# EAGLE board ecad-receiver-v5-receiver-brd (EAGLE 9.7.0)
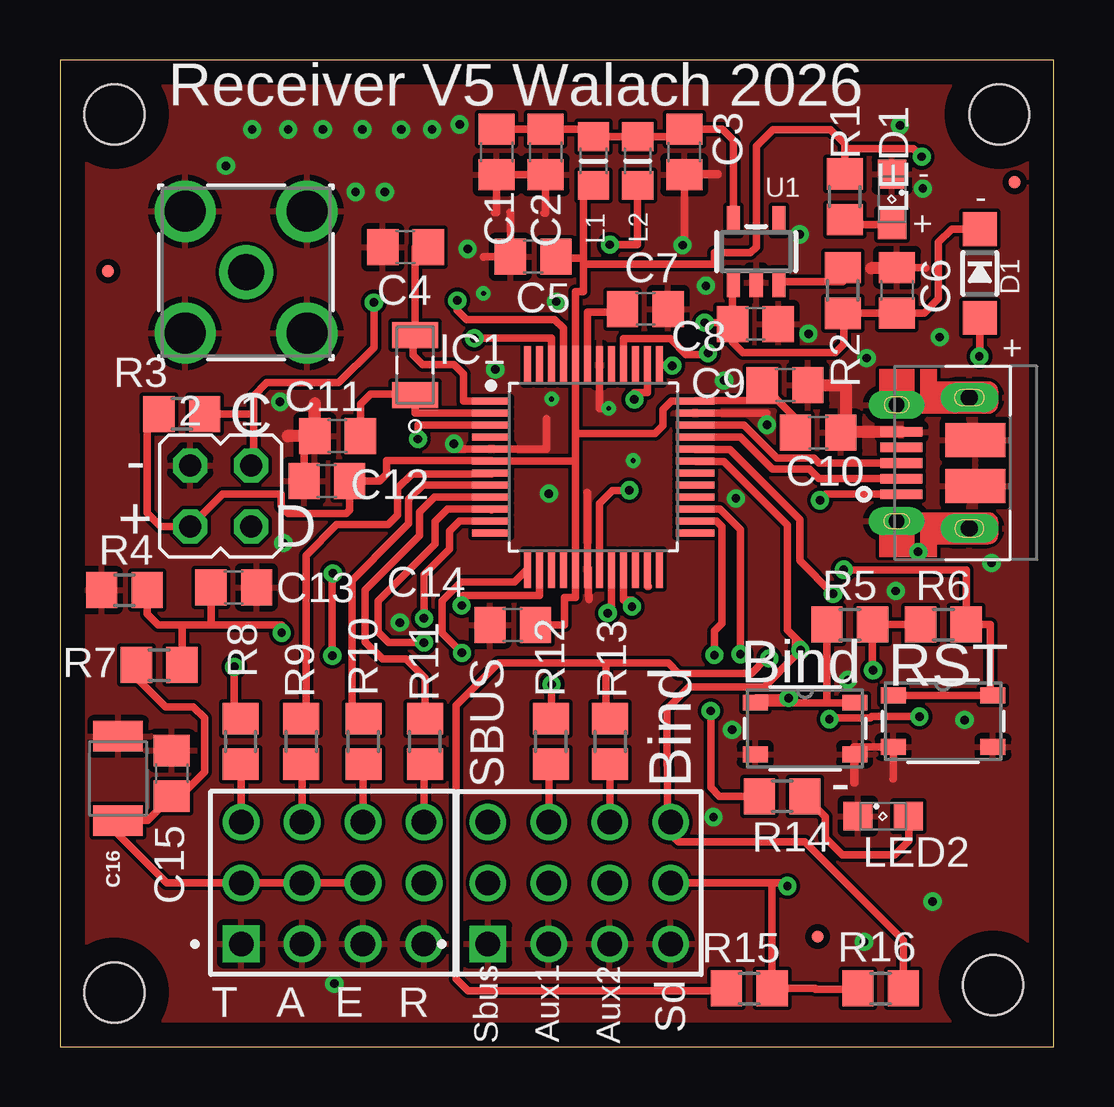
[diagram p0: board, top side]
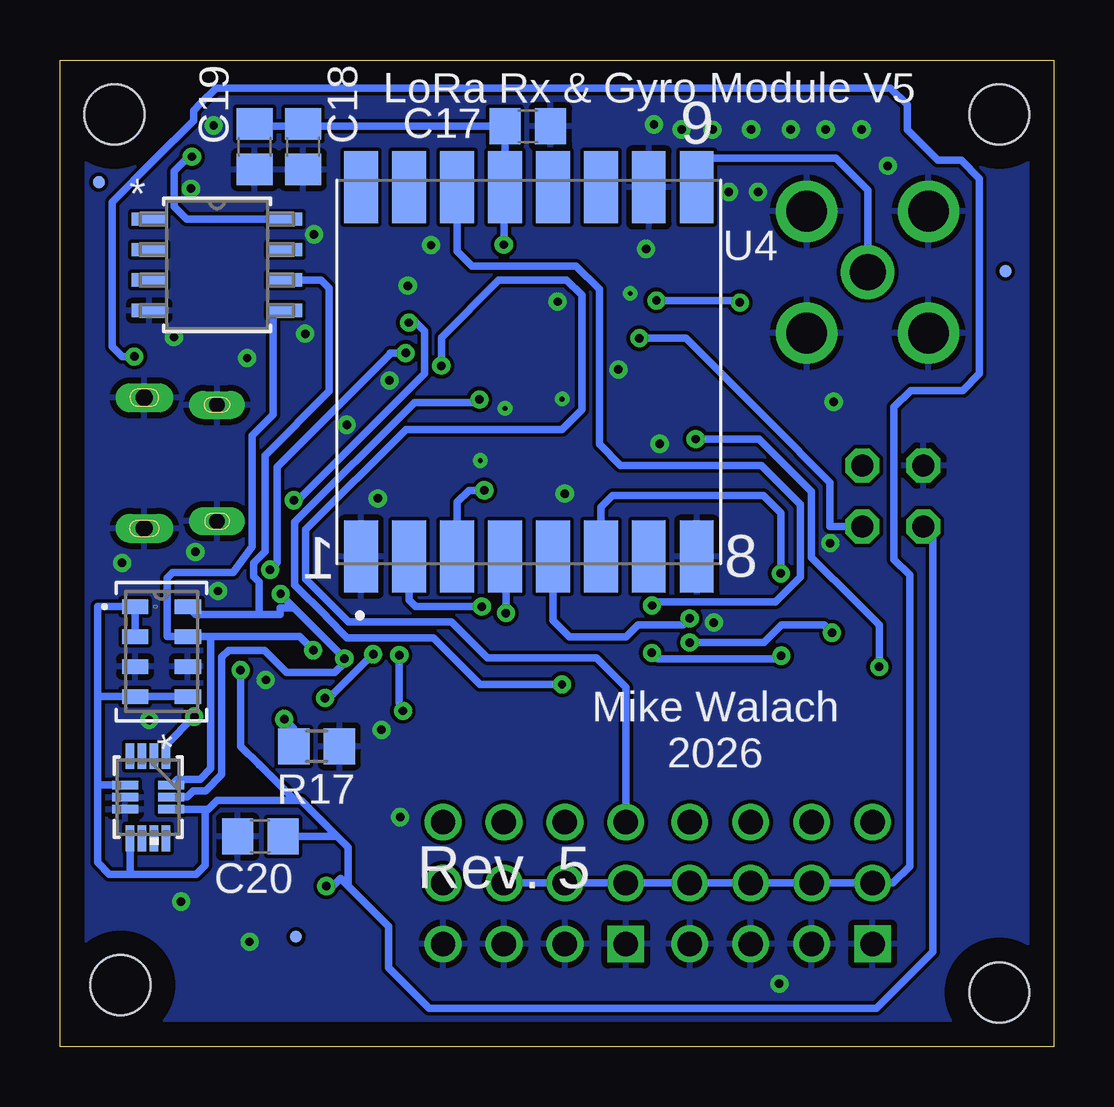
[diagram p1: board, bottom side, seen from below]

Size 41.42 x 41.13 mm. Coordinates in mm from the lower left corner, seen from the top.
Outline: 0,0 41.42,0 41.42,41.13 0,41.13 0,0
Copper layers (1*16): Top 0.035mm / dielectric 1.5mm / Bottom 0.035mm
Design rules "Fusion Electronics Design Rules": minimum track width 6mil, minimum drill 0.35mm, track to track 6mil, track to pad 6mil, pad to pad 6mil, via to via 6mil, smd to smd 6mil, copper to edge 40mil, drill to drill 6mil, minimum pad ring 10mil, minimum via ring 8mil, stop-mask expansion 4mil, vias tented up to drill 9999mil, thermal gap 10mil
Holes 2.5 mm at 2.27,2.27 38.9,2.57 39.16,38.87 2.27,38.87

## Footprints (pad centres in the part's own frame; a part is rotated, then mirrored left to right if it is on the bottom)
C0805 = smd 1.3 x 1.5: 1 -0.95,0; 2 0.95,0
1210 = smd 1.27 x 2.06: 1 -1.755,0; 2 1.755,0
MICROBUILDER_SOD-123 = smd 1.4 x 1.4: A 1.85,0; C -1.85,0
FID_020 = smd 0.508 x 0.508 bottom: FIDB 0,0 | smd 0.508 x 0.508: FIDT 0,0
QFP50P900X900X120-48 = smd 1.6 x 0.3: 1 -4.25,2.75; 2 -4.25,2.25; 3 -4.25,1.75; 4 -4.25,1.25; 5 -4.25,0.75; 6 -4.25,0.25; 7 -4.25,-0.25; 8 -4.25,-0.75; 9 -4.25,-1.25; 10 -4.25,-1.75; 11 -4.25,-2.25; 12 -4.25,-2.75; 25 4.25,-2.75; 26 4.25,-2.25; 27 4.25,-1.75; 28 4.25,-1.25; 29 4.25,-0.75; 30 4.25,-0.25; 31 4.25,0.25; 32 4.25,0.75; 33 4.25,1.25; 34 4.25,1.75; 35 4.25,2.25; 36 4.25,2.75 | smd 0.3 x 1.6: 13 -2.75,-4.25; 14 -2.25,-4.25; 15 -1.75,-4.25; 16 -1.25,-4.25; 17 -0.75,-4.25; 18 -0.25,-4.25; 19 0.25,-4.25; 20 0.75,-4.25; 21 1.25,-4.25; 22 1.75,-4.25; 23 2.25,-4.25; 24 2.75,-4.25; 37 2.75,4.25; 38 2.25,4.25; 39 1.75,4.25; 40 1.25,4.25; 41 0.75,4.25; 42 0.25,4.25; 43 -0.25,4.25; 44 -0.75,4.25; 45 -1.25,4.25; 46 -1.75,4.25; 47 -2.25,4.25; 48 -2.75,4.25
10103594 = smd 0.4 x 1.75: 1 -1.3,2.825; 2 -0.65,2.825; 3 0,2.825; 4 0.65,2.825; 5 1.3,2.825 | smd 1.425 x 2.5: 6 -0.963,-0.25; 7 0.963,-0.25 | drill 0.65 pad 0.73 long: SH1 -2.425,3.03; SH2 2.425,3.03 | drill 0.7 long: SH3 -2.725,0; SH4 2.725,0
TSW-104-07-F-T_SAMTEC_TSW-104-07-F-T = drill 1.02 pad 1.37 square: 01 -3.81,-2.54 | drill 1.02 pad 1.37: 02 -3.81,0; 03 -3.81,2.54; 04 -1.27,-2.54; 05 -1.27,0; 06 -1.27,2.54; 07 1.27,-2.54; 08 1.27,0; 09 1.27,2.54; 10 3.81,-2.54; 11 3.81,0; 12 3.81,2.54
JP2Q = drill 0.914 octagon: 1 -1.27,-1.27; 2 -1.27,1.27; 3 1.27,-1.27; 4 1.27,1.27
RC-MASTER-SMD_L0805MP = smd 1.2 x 1.3: 1 -1.016,0; 2 1.016,0
SML0805 = smd 1.2 x 1.2: A 1.05,0; C -1.05,0
R0805 = smd 1.3 x 1.5: 1 -0.95,0; 2 0.95,0
PTS810 = smd 1.041 x 0.66: 1 -2.075,1.075; 2 2.075,1.075; 3 -2.075,-1.075; 4 2.075,-1.075
MICROBUILDER_SOT23-5 = smd 0.55 x 1.2: 1 -0.95,-1.3; 2 0,-1.3; 3 0.95,-1.3; 4 0.95,1.3; 5 -0.95,1.3
132134_AMP = drill 1.499 pad 2.007: 1 0,0 | drill 1.702 pad 2.21: 2 -2.54,2.54; 3 -2.54,-2.54; 4 2.54,-2.54; 5 2.54,2.54
FPT-8P-M02_FUJ = smd 1.448 x 0.559: 1 -2.832,1.905; 2 -2.832,0.635; 3 -2.832,-0.635; 4 -2.832,-1.905; 5 2.832,-1.905; 6 2.832,-0.635; 7 2.832,0.635; 8 2.832,1.905
XCVR_RFM95W-915S2 = smd 3 x 1.4: 1 -7.7,7; 2 -7.7,5; 3 -7.7,3; 4 -7.7,1; 5 -7.7,-1; 6 -7.7,-3; 7 -7.7,-5; 8 -7.7,-7; 9 7.7,-7; 10 7.7,-5; 11 7.7,-3; 12 7.7,-1; 13 7.7,1; 14 7.7,3; 15 7.7,5; 16 7.7,7
SON8_MS5611_TEC = smd 1.092 x 0.61: 1 -1.1,1.875; 2 -1.1,0.625; 3 -1.1,-0.625; 4 -1.1,-1.875; 5 1.1,-1.875; 6 1.1,-0.625; 7 1.1,0.625; 8 1.1,1.875
LGA-14L_2P5X3X0P83_STM = smd 1.077 x 0.351: 1 -1.71,0.75; 2 -1.71,0.25; 3 -1.71,-0.25; 4 -1.71,-0.75; 8 1.71,-0.75; 9 1.71,-0.25; 10 1.71,0.25; 11 1.71,0.75 | smd 0.351 x 1.077: 5 -0.5,-0.956; 6 0,-0.956; 7 0.5,-0.956; 12 0.5,0.956; 13 0,0.956; 14 -0.5,0.956
XTAL_ABS07-32.768KHZ-T = smd 1.1 x 1.9: 1 -1.25,0; 2 1.25,0

## Placement (x,y rotation side)
C1  1uF  [C0805]  18.2,37.3 270 top
C2  10uF  [C0805]  20.24,37.3 270 top
C3  0.1uF  [C0805]  26.02,37.3 270 top
C4  22pF  [C0805]  14.41,33.33 180 top
C5  0.1uF  [C0805]  19.72,32.94 180 top
C6  10uF  [C0805]  34.89,31.53 90 top
C7  1uF  [C0805]  24.4,30.76 0 top
C8  220uF  [C0805]  28.99,30.13 0 top
C9  0.1uF  [C0805]  30.22,27.58 0 top
C10  1uF  [C0805]  31.6,25.59 0 top
C11  22pF  [C0805]  11.57,25.45 180 top
C12  0.1uF  [C0805]  11.12,23.59 180 top
C13  0.1uF  [C0805]  7.24,19.15 0 top
C14  0.1uF  [C0805]  18.87,17.59 180 top
C15  100nF  [C0805]  4.66,11.4 90 top
C16  22uF  [1210]  2.43,11.19 90 top
C17  1uF  [C0805]  21.92,38.37 0 bottom
C18  0.1uF  [C0805]  31.29,37.52 270 bottom
C19  10uF  [C0805]  33.31,37.52 270 bottom
C20  0.1uF  [C0805]  33.07,8.77 180 bottom
D1  [MICROBUILDER_SOD-123]  38.34,32.23 270 top
FD1  FID_20MIL  [FID_020]  39.8,36.04 0 top
FD2  FID_20MIL  [FID_020]  2.01,32.33 0 top
FD3  FID_20MIL  [FID_020]  31.59,4.59 0 top
IC1  ATSAMD21G  [QFP50P900X900X120-48]  22.23,24.16 0 top
J1  10103594  [10103594]  37.91,24.34 90 top
J2  3X4_MALE_HEADER  [TSW-104-07-F-T_SAMTEC_TSW-104-07-F-T]  11.36,6.83 0 top
J3  3X4_MALE_HEADER  [TSW-104-07-F-T_SAMTEC_TSW-104-07-F-T]  21.64,6.82 0 top
JP1  [JP2Q]  6.7,22.96 180 top
L1  [RC-MASTER-SMD_L0805MP]  22.24,36.92 270 top
L2  [RC-MASTER-SMD_L0805MP]  24.08,36.92 270 top
LED1  [SML0805]  34.68,35.32 270 top
LED2  [SML0805]  34.31,9.61 0 top
R1  2.2K  [R0805]  32.71,35.44 270 top
R2  100K  [R0805]  32.63,31.52 270 top
R3  1K  [R0805]  5.08,26.38 0 top
R4  1K  [R0805]  2.68,19.04 180 top
R5  1K  [R0805]  32.92,17.6 0 top
R6  1K  [R0805]  36.82,17.6 180 top
R7  10K  [R0805]  4.14,15.91 0 top
R8  330  [R0805]  7.53,12.73 270 top
R9  330  [R0805]  10.06,12.73 90 top
R10  330  [R0805]  12.65,12.73 270 top
R11  330  [R0805]  15.21,12.73 90 top
R12  330  [R0805]  20.46,12.73 90 top
R13  330  [R0805]  22.93,12.73 90 top
R14  2.2K  [R0805]  30.1,10.45 0 top
R15  10K  [R0805]  28.73,2.43 180 top
R16  10K  [R0805]  34.2,2.43 180 top
R17  1K  [R0805]  30.73,12.53 180 bottom
SW1  PTS810SJG250SMTRLFSPTS810  [PTS810]  36.81,13.57 0 top
SW2  PTS810SJG250SMTRLFSPTS810  [PTS810]  31.06,13.27 0 top
U1  [MICROBUILDER_SOT23-5]  29.02,33.15 0 top
U2  132134132134_AMP  [132134_AMP]  7.76,32.29 0 top
U3  MB85RC256VPNF-G-JNERE1FPT-8P-M02_FUJ  [FPT-8P-M02_FUJ]  34.88,32.59 0 bottom
U4  RFM95W-915S2  [XCVR_RFM95W-915S2]  21.87,28.13 90 bottom
U5  MS560702BA03-50SON8_MS5611_TEC  [SON8_MS5611_TEC]  37.19,16.47 0 bottom
U6  LSM6DSO32TRLGA-14L_2P5X3X0P83_STM  [LGA-14L_2P5X3X0P83_STM]  37.75,10.4 270 bottom
XTAL1  32.768kHz  [XTAL_ABS07-32.768KHZ-T]  14.8,28.41 90 top

## Library data of the parts
C1-C15 C17-C20 = rcl; SPICEPREFIX: C
C16 = SparkFun-Capacitors; PROD_ID: CAP-10381
D1 U1 = flightcomputer-2023
FD1-FD3 = fiducial; CATEGORY_L1: Fiducial Marks; DESCRIPTION: Fiducial Mark 0.508mm (20mil); PACKAGE: Surface Mount
IC1 = IC_Embedded; CATEGORY: IC_Embedded; CORE: ARM Cortex M0+; DESCRIPTION: Low-power, high-performance Microchip's ARM® Cortex®-M0+ based flash microcontroller; MANUFACTURER: Microchip Technology; MPN: ATSAMD21G; OPERATING_TEMP: variable; PACKAGE: TQFP-48; PART_STATUS: Active; ROHS_COMPLIANT: COMPLIANT; SERIES: SAM D21G; SUB-CATEGORY: Microcontroller; TYPE: 32 bit Microcontroller
J1 = Connector_USB; CATEGORY: Connectors; CONTACTS: 5; CURRENT-RATING: 1.8A; DESCRIPTION: CONN RCPT USB2.0 MICRO B SMD R/A; GENDER: Receptacle; MANUFACTURER: Amphenol ICC (FCI); MOUNT_TYPE: R/A; MPN: 10103594-0001LF; OPERATING_TEMPERATURE: -30°C ~ 80°C; PART_STATUS: ACTIVE; ROHS_COMPLIANT: COMPLIANT; SUB_CATEGORY: USB; TYPE: USB-micro B; VOLTAGE-RATING: 100VAC
J2 J3 = BOBCAT_Library; MANUFACTURER: Samtec; PARTREV: R; STANDARD: Manufacturer Recommendations
JP1 = jumper
L1 L2 = 52101-101-REV-A_v16
LED1 LED2 = led
R1-R17 = rcl; SPICEPREFIX: R
SW1 SW2 = 2024-06-17_17-27-14_Library; COPYRIGHT: Copyright (C) 2024 Ultra Librarian. All rights reserved.; MANUFACTURER_PART_NUMBER: PTS810SJG250SMTRLFS; MFR_NAME: C&K Components
U2 = 2025-03-19_02-22-58_Library; COPYRIGHT: Copyright (C) 2025 Ultra Librarian. All rights reserved.; MANUFACTURER_PART_NUMBER: 132134; MFR_NAME: Amphenol ICC
U3 = 2025-09-02_13-41-18_Library; COPYRIGHT: Copyright (C) 2025 Ultra Librarian. All rights reserved.; MANUFACTURER_NAME: Fujitsu Semiconductor; MANUFACTURER_PART_NUMBER: MB85RC256VPNF-G-JNERE1
U4 = RFM95W-915S2; AVAILABILITY: In Stock; CHECK_PRICES: https://www.snapeda.com/parts/RFM95W-915S2/RF/view-part/?ref=eda; DESCRIPTION: 802.15.4 LoRa™ Transceiver Module 915MHz Antenna Not Included Surface Mount; MF: RF Solutions; MP: RFM95W-915S2; PACKAGE: Non Standard RF Solutions; PRICE: None; PURCHASE-URL: https://www.snapeda.com/api/url_track_click_mouser/?unipart_id=585488&manufacturer=RF Solutions&part_name=RFM95W-915S2&search_term=None; SNAPEDA_LINK: https://www.snapeda.com/parts/RFM95W-915S2/RF/view-part/?ref=snap
U5 = 2025-03-19_19-02-07_Library; COPYRIGHT: Copyright (C) 2025 Ultra Librarian. All rights reserved.; MANUFACTURER_PART_NUMBER: MS560702BA03-50; MFR_NAME: TE Connectivity
U6 = LSM6DSO32TR_extendedpads_fixed_v2; COPYRIGHT: Copyright (C) 2026 Ultra Librarian. All rights reserved.; DATASHEET: https://www.st.com/resource/en/datasheet/lsm6dso32.pdf; DESCRIPTION: 6-axis IMU (inertial measurement unit): 3-axis accelerometer and 3-axis gyroscope; MANUFACTURER_NAME: STMicroelectronics; MANUFACTURER_PART_NUMBER: LSM6DSO32TR
XTAL1 = Crystal-WA; CATEGORY: Crystal; MANUFACTURER: Abracon LLC; MPN: ABS07-32.768KHZ-T; OPERATING_TEMPERATURE: -40°C ~ 85°C; PART_STATUS: ACTIVE; ROHS_COMPLIANT: COMPLIANT; SERIES: ABS07; SUB_CATEGORY: Crystal Surface Mount; TYPE: Crystal

## Nets
+3.3_LORA: C17.1 C18.1 C19.1 L2.2 U4.13
+3.3_MCU: C5.1 C9.1 C10.1 C12.1 C14.1 C20.1 IC1.6 IC1.17 IC1.36 IC1.44 J3.11 JP1.4 L1.2 R1.1 R3.1 R5.2 R6.2 R15.1 R16.2 U3.8 U5.1 U5.2 U5.4 U5.5 U6.5 U6.8 U6.12
+5V: C15.1 C16.1 D1.A J2.02 J2.05 J2.08 J2.11 J3.02 J3.05 J3.08 R7.1
A0: IC1.3 R8.1
A1: IC1.7 R9.2
A2: IC1.8 R10.1
A3: IC1.9 R11.2
A4: C13.1 IC1.10 R4.1 R7.2
A5: IC1.47
AREF: IC1.4
D0: IC1.16
D1: IC1.15
D2: IC1.23
D5: IC1.24
D6: IC1.29
D7: IC1.30
D9: IC1.12
D12: IC1.28
D13: IC1.26 R14.1
D+: IC1.34 J1.3
D-: IC1.33 J1.2
DIO0: IC1.14 U4.14
DIO1: U4.15
DIO2: U4.16
DIO3: U4.11
DIO4: U4.12
DIO5: U4.7
GND: C1.2 C2.2 C3.2 C4.2 C5.2 C6.2 C7.2 C8.2 C9.2 C10.2 C11.2 C12.2 C13.2 C14.2 C15.2 C16.2 C17.2 C18.2 C19.2 C20.2 IC1.5 IC1.18 IC1.35 IC1.42 J1.5 J1.6 J1.7 J1.SH1 J1.SH2 J1.SH3 J1.SH4 J2.01 J2.04 J2.07 J2.10 J3.01 J3.04 J3.07 J3.10 JP1.3 LED1.C LED2.C R4.2 R17.1 SW1.3 SW1.4 SW2.3 SW2.4 U1.2 U2.2 U2.3 U2.4 U2.5 U3.4 U4.1 U4.8 U4.10 U5.3 U5.6 U6.6 U6.7
LORA_ANT: U2.1 U4.9
LORA_RESET: IC1.13 U4.6
MISO: IC1.21 U4.2
MOSI: IC1.19 U4.3
N$1: R17.2 U6.1
N$2: C7.1 IC1.43
N$3: J3.06 R12.1
N$4: J2.12 R11.1
N$5: R2.1 U1.3
N$6: J3.09 R13.1
N$7: J2.09 R10.2
N$8: LED2.A R14.2
N$9: U3.7
N$10: J2.03 R8.2
N$11: U3.3
N$12: C11.1 IC1.2 XTAL1.1
N$13: U3.2
N$14: U3.1
N$15: C4.1 IC1.1 XTAL1.2
N$16: J2.06 R9.1
N$30: LED1.A R1.2
NSS: IC1.11 U4.5
OUT: C1.1 C2.1 C3.1 L1.1 L2.1 U1.5
RESET: IC1.40 R6.1 SW1.1 SW1.2
RXD: IC1.38 R12.2
RXLED: IC1.48
SCK: IC1.20 U4.4
SCL: IC1.32 R13.2 R15.2 U3.6 U5.8 U6.13
SDA: IC1.31 J3.12 R16.1 U3.5 U5.7 U6.14
SW1: IC1.27 R5.1 SW2.1 SW2.2
SW3: IC1.25
SWCLK: IC1.45 JP1.1 R3.2
SWDIO: IC1.46 JP1.2
TXD: IC1.37 J3.03
TXLED: IC1.39
VBUS: C6.1 C8.1 D1.C J1.1 R2.2 U1.1

## Tracks (layer width: path | path; a pad name or v marks a point on that pad's centre or on a via)
+3.3_LORA  (via drill 0.35)
  Top 0.305: L2.2 24.08,33.44 v22.92,33.44
  Bottom 0.305: v22.92,33.44 22.92,35.83 U4.13 C17.1 31.29,38.37 | 31.29,38.37 C18.1 | C19.1 33.31,38.37 31.29,38.37
+3.3_MCU  (via drill 0.35, 0.35 pad 0.25)
  Top 0.305: L1.2 21.82,35.9 21.82,32.88 | 21.82,32.88 20.67,32.88 C5.1 | 21.82,32.63 21.82,31.48 21.49,31.48 IC1.44 21.48,25.56 | 21.82,32.63 21.82,32.88 | 21.48,24.41 IC1.6 17.98,24.44 13.62,24.44 13.62,23.88 13.32,23.59 C12.1 12.07,22.38 11.92,22.23 9.52,22.23 9.21,22.54 9.21,23.04 6.78,23.04 JP1.4 4.2,21.69 3.63,22.26 3.63,25.89 R3.1 | 21.48,24.41 IC1.17 21.48,18.72 21.04,18.72 21.04,17.59 C14.1 | 29.92,26.94 26.5,26.94 IC1.36 25.48,26.91 25.13,26.56 25.13,25.9 24.79,25.56 21.48,25.56 | 21.48,25.56 21.48,24.41 | R6.2 R5.2 33.87,15.92 v33.89,15.7 | R1.1 32.71,37.45 | 32.71,37.45 32.71,37.65 32.12,38.23 29.72,38.23 29.02,37.53 29.02,33.34 28.79,33.1 27.27,33.1 27.27,32.63 21.82,32.63 | 29.92,26.94 C9.1 | C10.1 30.65,26.2 29.92,26.94 | v35.92,37.1 35.58,37.45 32.71,37.45 | R16.2 33.23,2.4 31.48,2.4 31.48,2.43 R15.1 29.69,6.78 29.64,6.82 | J3.11 29.64,6.82 | 29.64,6.82 30.2,6.82 v30.32,6.7
  Bottom 0.305: U5.5 U5.4 39.86,14.6 | U5.2 U5.1 39.86,18.35 39.86,14.6 | 31.63,10.28 33.11,11.75 33.13,11.75 33.13,11.76 33.89,12.53 v33.89,15.7 | 29.88,8.77 31.38,10.28 31.63,10.28 | v35.92,37.1 36.05,37.1 36.66,36.5 36.66,35.02 36.13,34.5 U3.8 | C20.1 29.88,8.77 | 31.63,10.28 34.87,10.28 35.24,9.9 35.37,9.9 | 39.86,14.6 39.86,10.93 | 39.86,10.93 39.86,7.68 39.37,7.19 38.5,7.19 | JP1.4 5.05,21.3 5.05,3.96 7.4,1.6 26.05,1.6 27.73,3.29 27.73,5.02 29.41,6.71 | 29.88,8.77 29.41,8.31 29.41,6.71 | 29.41,6.71 29.73,7.02 30.05,6.7 v30.32,6.7 | 38.5,7.19 35.75,7.19 35.37,7.57 35.37,9.9 | U6.12 35.37,9.9 | U6.5 38.73,10.93 39.86,10.93 | U6.8 38.5,7.19
+5V  (via drill 0.35)
  Top 0.305: v38.32,28.78 38.34,28.78 D1.A | J2.08 J2.05 J2.02 4.44,6.83 2.32,8.95 | 4.29,10.08 C15.1 | R7.1 3.19,15.39 4.41,14.17 5.55,14.17 6.03,13.7 6.03,11.47 5.01,10.45 C15.1 | C15.1 3.65,9.43 C16.1
  Bottom 0.305: 37.51,36.95 35.85,38.61 35.85,39.03 35.57,39.31 34.91,39.97 6.81,39.97 6.11,39.27 6.11,38.22 4.84,36.95 3.85,36.95 3.09,36.19 3.09,28.06 3.79,27.36 5.96,27.36 6.66,26.66 6.66,20.31 6,19.66 6,7.52 6.7,6.83 J2.02 J2.05 J2.08 J2.11 J3.02 J3.05 J3.08 | 37.51,36.95 37.52,36.95 | v38.32,28.78 v38.32,28.77 38.84,28.77 39.26,29.19 39.26,35.2 37.51,36.95
A0  (via drill 0.35)
  Top 0.305: IC1.3 14.92,25.91 v14.92,25.34 | v7.27,15.84 7.27,13.94 R8.1
  Bottom 0.305: v7.27,15.84 7.27,17.58 8.23,18.54 10.1,20.4 10.1,23.14 12.3,25.34 v14.92,25.34
A1
  Top 0.305: IC1.7 17.98,23.87 14.67,23.87 14.08,23.29 14.08,22.17 13.69,21.77 11.54,21.77 10.25,20.48 10.25,13.87 R9.2
A2
  Top 0.305: IC1.8 15.13,23.41 14.54,22.82 14.54,21.8 14.02,21.28 12.17,19.44 12.17,14.16 R10.1
A3
  Top 0.305: IC1.9 15.61,22.91 15,22.3 15,21.32 14.5,20.83 12.72,19.05 12.72,16.88 13.44,16.17 14.42,16.17 15.21,15.38 R11.2
A4  (via drill 0.35)
  Top 0.305: v15.17,16.85 13.7,16.85 13.26,17.29 13.26,18.58 14.97,20.3 15.64,20.96 15.64,21.89 16.16,22.41 IC1.10 17.98,22.37 | 6.3,17.59 9.24,17.59 v9.24,17.26 | 6.3,17.59 5.09,17.59 | 5.09,17.59 4.1,17.59 3.63,18.05 R4.1 | C13.1 6.3,17.59 | R7.2 5.09,17.59
  Bottom 0.305: v15.17,16.85 12.09,16.85 11.36,17.58 9.56,17.58 v9.24,17.26
D2
  Top 0.305: IC1.23 24.48,19.18 24.53,19.18
D13  (via drill 0.35)
  Top 0.305: R14.1 27.5,10.45 27.13,10.82 v27.13,14 | IC1.26 27.37,21.91 27.59,21.69 27.59,17.65 27.28,17.34 v27.28,16.33
  Bottom 0.305: v27.13,14 27.13,14.17 27.28,14.32 v27.28,16.33
D+
  Top 0.305: IC1.34 28.5,25.91 29.88,24.54 31.42,24.54 31.63,24.34 J1.3
D-
  Top 0.305: IC1.33 28.36,25.41 29.69,24.08 31.23,24.08 31.63,23.69 J1.2
DIO0  (via drill 0.35)
  Top 0.305: v16.74,18.4 16.79,18.4 16.79,18.81 19.98,18.81 IC1.14
  Bottom 0.305: 24.46,35.42 U4.14 24.87,33.17 24.25,32.55 19.91,32.55 18.94,31.58 18.94,25.12 18.06,24.23 12.19,24.23 10.55,22.6 10.55,19.59 11.59,18.55 16.59,18.55 v16.74,18.4
GND  (via drill 0.2 pad 0.25, 0.35, 0.35 pad 0.25)
  Top 0.305: C12.2 10.17,25.45 C11.2 | 21.98,23.11 IC1.18 22.03,19.91 22.03,18.81 22.06,18.81 22.06,18.65 | C3.2 26.02,33.42 v25.95,33.42 | C3.2 27.42,36.35 27.42,36.4 26.02,36.4 C3.2 | 18.12,34.76 18.2,34.76 C1.2 C2.2 20.24,34.75 20.17,34.75 | 18.76,34.8 18.77,34.8 C5.2 17.66,32.94 17.66,32.92 | C8.2 29.94,30.27 | C6.2 36.1,32.48 36.1,32.47 | IC1.42 22.48,26.61 v22.87,26.61 | IC1.35 29.47,26.41 v29.47,25.92 | v16.42,25.13 16.42,24.91 IC1.5 20.28,24.91 20.28,26.18 | SW2.4 33.13,11 33.09,11 33.09,12.5 SW1.3 34.74,11.16 34.72,11.16
  Top 0.508: C6.2 34.89,32.45 33.81,32.45 | C9.2 32.75,27.58 32.75,25.59 C10.2 32.59,25.63 J1.5 | C11.2 10.62,26.82 C11.2 | C11.2 9.49,25.45 9.49,25.48 | 1.71,19.04 R4.2
  other vias: 9.17,26.88 6.92,36.72 8.01,38.24 9.51,38.24 10.96,38.24 12.61,38.24 14.22,38.23 13.54,35.63 12.32,35.63 36.67,29.59 35.97,35.78 35.02,38.41 16.99,33.26 26.93,31.73 31.2,29.72 9.31,20.99 16.66,38.45 15.51,38.24 20.68,31.06 18.15,28.23 20.38,23.06 27.69,27.78 38.84,20.17 35.78,20.63 30.84,33.87 33.62,28.71 14.17,17.69 20.49,27 17.66,31.41 23.9,24.44 33.52,4.37 27.24,9.58 28.02,13.21 11.44,2.63 28.18,22.86 37.71,13.62 36.37,6.05 34.84,19 32.85,15.29
  pour Bottom: -2.33,-1.78 43.86,-1.78 43.86,42.79 -2.51,42.79 -2.35,42.59 -2.34,42.58 -2.34,42.58 -2.34,42.57 -2.34,42.56 -2.33,42.55 -2.33,42.55 -2.33,42.54 -2.33,42.53
  pour Top: -2.62,-2.4 44.06,-2.4 44.06,43.2 -2.59,43.2 -2.6,43.2 -2.61,43.2 -2.61,43.2 -2.62,43.21
LORA_ANT
  Bottom 0.305: U4.9 14.92,35.83 14.92,37.04 9.08,37.04 7.76,35.72 U2.1
LORA_RESET  (via drill 0.35)
  Top 0.305: v11.37,19.73 11.35,19.73 v11.35,16.3 | IC1.13 18.95,19.38 16.72,19.38 15.92,18.59 15.92,17.25 v16.75,16.42
  Bottom 0.305: U4.6 18.87,22.5 18.39,22.98 12.11,22.98 11.37,22.25 v11.37,19.73 | v11.35,16.3 11.35,16.17 16.5,16.17 v16.75,16.42
MISO  (via drill 0.35)
  Top 0.305: IC1.21 23.48,18.63 23.84,18.63 v23.84,18.35
  Bottom 0.305: U4.2 26.87,18.63 26.59,18.35 v23.84,18.35
MOSI  (via drill 0.35 pad 0.25)
  Top 0.305: v23.74,23.2 23.02,23.2 22.48,22.66 IC1.19
  Bottom 0.305: v23.74,23.2 24.38,23.2 24.87,22.7 U4.3
N$1  (via drill 0.35)
  Top 0.305: v35.83,13.76 33.84,13.76 33.78,13.71 32.12,13.71 v32.07,13.66
  Bottom 0.305: v32.07,13.66 31.68,13.26 R17.2 | U6.1 37,12.59 v35.83,13.76
N$2
  Top 0.305: C7.1 23.45,30.63 21.98,30.63 IC1.43
N$3
  Top 0.305: J3.06 20.38,11.69 R12.1
N$4
  Top 0.305: J2.12 15.17,11.74 R11.1
N$5
  Top 0.305: R2.1 32.63,31.9 30.02,31.9 U1.3
N$6
  Top 0.305: R13.1 22.93,9.38 J3.09
N$7
  Top 0.305: J2.09 12.63,11.76 R10.2
N$8
  Top 0.305: R14.2 31.91,9.59 31.91,8.7 32.6,8 34.8,8 35.38,8.58 35.38,9.59 LED2.A
N$10
  Top 0.305: 7.53,11.8 R8.2 7.55,11.76 J2.03
N$12
  Top 0.305: IC1.2 14.8,26.41 XTAL1.1 14.75,27.21 12.95,27.21 12.52,26.78 C11.1
N$15
  Top 0.305: IC1.1 16.82,26.91 16.82,28.03 16.42,28.44 15.12,28.44 14.72,28.84 14.72,29.66 XTAL1.2 14.8,33.33 C4.1
N$16
  Top 0.305: J2.06 10.09,11.74 R9.1
N$30
  Top 0.305: LED1.A 32.71,34.27 R1.2
NSS  (via drill 0.35)
  Top 0.305: IC1.11 16.65,21.91 16.23,21.5 16.23,20.75 15.17,19.7 v15.17,17.86
  Bottom 0.305: U4.5 20.87,17.78 20.18,17.09 17.82,17.09 17.32,17.59 15.45,17.59 v15.17,17.86
OUT
  Top 0.305: C1.1 C2.1 22.24,38.25 L1.1 L2.1 25.71,37.94 C3.1 27.61,38.25 28.07,37.78 U1.5
RESET  (via drill 0.35)
  Top 0.305: 38.77,14.65 SW1.2 | 38.77,14.65 38.77,17.6 R6.1 37.77,19.88 v32.67,19.88 | IC1.40 23.48,29.52 25.44,29.52 26.1,28.86 27.02,28.86 v27.02,28.92 | 38.77,14.65 SW1.1
  Bottom 0.305: v32.67,19.88 32.36,20.19 32.36,24.17 27.67,28.87 27.67,28.92 v27.02,28.92
RXD  (via drill 0.35)
  Top 0.305: IC1.38 24.48,27.28 23.94,27.28 v23.94,26.98 | v20.5,15.11 20.5,13.71 R12.2
  Bottom 0.305: v23.94,26.98 24.07,26.86 26.64,26.86 31.63,21.86 31.63,19.25 30.34,17.96 30.34,17.93 29.46,17.05 25.86,17.05 23.91,15.11 v20.5,15.11
SCK  (via drill 0.35)
  Top 0.305: IC1.20 22.98,18.23 v22.83,18.08
  Bottom 0.305: U4.4 22.83,20.39 v22.83,18.08
SCL  (via drill 0.35)
  Top 0.152: 27.27,1.91 R15.2
  Top 0.305: IC1.32 27.93,24.91 30.84,21.99 30.84,20.26 v32.23,18.88 | R15.2 27.68,2.33 17,2.33 16.5,2.83 16.5,14.22 18.28,16 22.76,16 | R13.2 22.76,13.85 22.76,16 | 22.76,16 25.36,16 25.78,15.57 28.83,15.57 29.43,16.18 v29.57,16.18
  Bottom 0.305: 33.12,18.02 32.26,18.02 32.26,18.29 31.66,18.29 | U5.8 35.77,18.02 33.12,18.02 | U3.6 30.53,31.96 30.2,31.63 30.2,27.32 32.88,24.65 32.88,20.65 33.35,20.17 33.35,19.6 33.12,19.37 33.12,18.02 | 31.66,18.29 29.57,16.2 v29.57,16.18 29.57,16.01 29.97,15.61 31.98,15.61 32.9,16.52 34.4,16.52 34.68,16.24 34.68,11.35 35.36,10.67 35.44,10.67 | 31.66,18.29 32.23,18.86 v32.23,18.88 | U6.13 36.77,10.42 36.13,10.42 35.88,10.67 35.44,10.67 | 35.45,10.66 35.44,10.66 35.44,10.67
SDA  (via drill 0.35)
  Top 0.305: IC1.31 26.5,24.4 27.68,24.4 30.33,21.75 30.33,17.37 30.67,17.03 | 25.33,9.32 25.16,9.15 25.77,8.54 31.05,8.54 35.16,4.43 R16.1 | J3.12 25.33,9.24 25.33,9.32 | 25.33,9.32 25.3,14.09 26.21,15 29.36,15 30.67,16.31 30.67,17.03 | 30.67,17.03 30.87,16.83 v30.87,16.53
  Bottom 0.305: 35.14,17.1 U5.7 36.96,17.1 36.96,19.55 36.73,19.78 34.2,19.78 33.41,20.86 33.41,25.48 32.55,26.35 32.55,30.69 U3.5 | 35.14,17.1 35.14,11.59 35.58,11.15 36.54,11.15 U6.14 | 35.14,17.1 31.44,17.1 v30.87,16.53
SW1  (via drill 0.35)
  Top 0.305: v30.37,14.54 28.98,14.54 SW2.1 31.97,14.34 | 31.97,14.34 SW2.2 | 31.97,14.34 R5.1 | IC1.27 27.51,22.41 28.37,21.56 v28.37,16.37
  Bottom 0.305: v28.37,16.37 30.2,14.54 v30.37,14.54
SWCLK  (via drill 0.35 pad 0.25)
  Top 0.305: JP1.1 8.07,24.23 8.07,26.38 | 8.07,26.38 8.07,27.13 8.62,27.69 11.62,27.69 13.08,29.15 v13.08,31.03 | IC1.45 20.98,29.96 20.62,30.32 16.94,30.32 16.56,30.7 v16.56,31.11 | R3.2 8.07,26.38
  Bottom 0.305: v16.56,31.11 13.16,31.11 v13.08,31.03
SWDIO  (via drill 0.35)
  Top 0.305: IC1.46 20.48,29.53 v17.27,29.53
  Bottom 0.305: v17.27,29.53 15.33,29.53 12.87,27.08 11.88,26.09 9.32,23.53 9.32,21.69 JP1.2
TXD  (via drill 0.35)
  Top 0.305: IC1.37 25.53,28.41 v25.53,28.39
  Bottom 0.305: v25.53,28.39 25.53,29.57 23.13,31.96 20.3,31.96 19.67,31.33 19.67,26.56 20.49,25.74 27,25.74 31.18,21.56 31.18,19.49 29.39,17.7 25.1,17.7 23.6,16.2 19.06,16.2 17.84,14.97 J3.03
VBUS  (via drill 0.35 pad 0.25)
  Top 0.305: C8.1 28.04,31.84 U1.1 | 32.67,30.59 C6.1 36.02,30.59 36.62,31.19 36.62,33.53 37.17,34.09 D1.C | 32.67,30.59 R2.2 | C8.1 28.04,29.37 28.47,28.94 32.32,28.94 32.67,29.28 32.67,30.59 | v26.87,30.19 28.04,30.19 C8.1 | J1.1 31.93,23.04 v31.68,22.78
  Bottom 0.305: v26.87,30.19 26.57,30.19 26.22,29.83 26.22,28.07 31.5,22.78 v31.68,22.78

## Text on the board
tNames: Receiver V5 Walach 2026 | - | - | + | + | C | - | + | D | Bind | RST | SBUS | Bind | - | Aux2 | Sd | T | A | E | R | Sbus | Aux1
bNames: LoRa Rx & Gyro Module V5 | 9 | 8 | 1 | Mike Walach / 2026 | Rev. 5